# EAGLE board 3lab (EAGLE 9.7.0)

Size 215.32 x 129.19 mm. Coordinates in mm from the lower left corner, seen from the top.
Outline: 0,0 215.32,0 215.32,129.19 0,129.19 0,0
Copper layers (1*16): Top 0.035mm / dielectric 1.5mm / Bottom 0.035mm
Design rules "default": minimum track width 6mil, minimum drill 0.35mm, track to track 6mil, track to pad 6mil, pad to pad 6mil, via to via 6mil, smd to smd 6mil, copper to edge 40mil, drill to drill 6mil, minimum pad ring 10mil, minimum via ring 8mil, stop-mask expansion 4mil, vias tented up to drill 0mil, thermal gap 10mil

## Footprints (pad centres in the part's own frame; a part is rotated, then mirrored left to right if it is on the bottom)
LEDRD254W60D565H860B_B = drill 0.981 pad 1.581: 1 -1.27,0; 2 1.27,0
LEDRD254W60D565H860B = drill 0.981 pad 1.581: 1 -1.27,0; 2 1.27,0
LEDRD254W60D565H860B_G = drill 0.981 pad 1.581: 1 -1.27,0; 2 1.27,0
LEDRD254W60D565H860B_Y = drill 0.981 pad 1.581: 1 -1.27,0; 2 1.27,0
RESAD1016W63L850D250B = drill 0.83 pad 1.43: 1 -5.08,0; 2 5.08,0
HA-06-SM065 = drill 1 pad 1.676: 1 -2.54,-2.54; 2 0,2.54; 3 2.54,-2.54
SWITCH-MOMENTARY-PTH-6.5MM = drill 1.016 pad 1.88: 1 -3.251,2.261; 2 3.251,2.261; 3 -3.251,-2.261; 4 3.251,-2.261
SG90 = drill 1.016 long: 1 -2.54,0; 2 0,0; 3 2.54,0
ARDUINO-UNO-R3-SHIELD = drill 1.016 pad 1.88: 3.3V 24.13,-2.54; 5V 24.13,0; A0 24.13,12.7; A1 24.13,15.24; A2 24.13,17.78; A3 24.13,20.32; A4 24.13,22.86; A5 24.13,25.4; AREF -24.13,-13.97; D2 -24.13,20.32; D3 -24.13,17.78; D4 -24.13,15.24; D5 -24.13,12.7; D6 -24.13,10.16; D7 -24.13,7.62; D8 -24.13,3.81; D9 -24.13,1.27; D10 -24.13,-1.27; D11 -24.13,-3.81; D12 -24.13,-6.35; D13 -24.13,-8.89; GND@0 24.13,2.54; GND@1 24.13,5.08; GND@2 -24.13,-11.43; IOREF 24.13,-7.62; NC 24.13,-10.16; RES 24.13,-5.08; RX -24.13,25.4; SCL -24.13,-19.05; SDA -24.13,-16.51; TX -24.13,22.86; VIN 24.13,7.62
DIP762W53P254L1969H508Q16B = drill 0.743 pad 1.343: 1 -3.81,8.89; 2 -3.81,6.35; 3 -3.81,3.81; 4 -3.81,1.27; 5 -3.81,-1.27; 6 -3.81,-3.81; 7 -3.81,-6.35; 8 -3.81,-8.89; 9 3.81,-8.89; 10 3.81,-6.35; 11 3.81,-3.81; 12 3.81,-1.27; 13 3.81,1.27; 14 3.81,3.81; 15 3.81,6.35; 16 3.81,8.89

## Placement (x,y rotation side)
D2  BLUE  [LEDRD254W60D565H860B_B]  183.05,8.86 0 top
D3  BLUE  [LEDRD254W60D565H860B_B]  178.14,9 0 top
D4  BLUE  [LEDRD254W60D565H860B_B]  193.08,8.63 0 top
D5  BLUE  [LEDRD254W60D565H860B_B]  188.02,8.75 0 top
D6  RED  [LEDRD254W60D565H860B]  203.91,8.21 0 top
D7  GREEN  [LEDRD254W60D565H860B_G]  198.64,8.38 0 top
D8  YELLOW  [LEDRD254W60D565H860B_Y]  209.26,7.91 0 top
R1  220  [RESAD1016W63L850D250B]  156.34,30.42 90 top
R2  220  [RESAD1016W63L850D250B]  146.81,30.47 90 top
R3  220  [RESAD1016W63L850D250B]  163.23,30.42 90 top
R4  220  [RESAD1016W63L850D250B]  153.05,30.43 90 top
R5  220  [RESAD1016W63L850D250B]  159.56,30.25 90 top
R6  220  [RESAD1016W63L850D250B]  149.79,30.45 90 top
R10  220  [RESAD1016W63L850D250B]  167.02,30.18 90 top
RPOT1  250k  [HA-06-SM065]  112.81,82.57 0 top
S1  SWITCH_MOMENTARY  [SWITCH-MOMENTARY-PTH-6.5MM]  125.51,94 90 top
SERVO1  SERVOSG90  [SG90]  137.78,23.86 0 top
U1  ARDUINO-UNO-R3-SHIELD  [ARDUINO-UNO-R3-SHIELD]  47.88,99.35 270 top
U2  74HC595_PDIP  [DIP762W53P254L1969H508Q16B]  157.26,94 90 top

## Library data of the parts
D2-D5 = Tinkercad; CATEGORY: Opto-Electronic; SUB-CATEGORY: LED; VALUE: LED_BLUE
D6 = Tinkercad; CATEGORY: Opto-Electronic; SUB-CATEGORY: LED; VALUE: LED_RED
D7 = Tinkercad; CATEGORY: Opto-Electronic; SUB-CATEGORY: LED; VALUE: LED_GREEN
D8 = Tinkercad; CATEGORY: Opto-Electronic; SUB-CATEGORY: LED; VALUE: LED_YELLOW
R1-R6 R10 RPOT1 S1 SERVO1 U1 U2 = Tinkercad

## Nets
D2_A: D2.1 R6.1
D3_A: D3.1 R2.1
D4_A: D4.1 R1.1
D5_A: D5.1 R4.1
D6_A: D6.1 R3.1
D7_A: D7.1 R5.1
D8_A: D8.1 R10.1
U1_5V: RPOT1.1 SERVO1.2 U1.5V U2.10 U2.16
U1_A0: RPOT1.2 U1.A0
U1_D2: S1.1 S1.2 U1.D2
U1_D4: U1.D4 U2.14
U1_D7: U1.D7 U2.11
U1_D8: U1.D8 U2.12
U1_D9: SERVO1.3 U1.D9
U1_GND: D2.2 D3.2 D4.2 D5.2 D6.2 D7.2 D8.2 RPOT1.3 S1.3 S1.4 SERVO1.1 U1.GND@0 U1.GND@1 U1.GND@2 U2.8 U2.13
U2_Q1: R2.2 U2.1
U2_Q2: R6.2 U2.2
U2_Q3: R4.2 U2.3
U2_Q4: R1.2 U2.4
U2_Q5: R5.2 U2.5
U2_Q6: R3.2 U2.6
U2_Q7: R10.2 U2.7

## Tracks (layer width: path | path; a pad name or v marks a point on that pad's centre or on a via)
D2_A  (1 unrouted)
D3_A  (1 unrouted)
D4_A  (1 unrouted)
D5_A  (1 unrouted)
D6_A  (1 unrouted)
D7_A  (1 unrouted)
D8_A  (1 unrouted)
U1_5V  (4 unrouted)
U1_A0  (1 unrouted)
U1_D2  (2 unrouted)
U1_D4  (1 unrouted)
U1_D7  (1 unrouted)
U1_D8  (1 unrouted)
U1_D9  (1 unrouted)
U1_GND  (15 unrouted)
U2_Q1  (1 unrouted)
U2_Q2  (1 unrouted)
U2_Q3  (1 unrouted)
U2_Q4  (1 unrouted)
U2_Q5  (1 unrouted)
U2_Q6  (1 unrouted)
U2_Q7  (1 unrouted)